# Altium PCB DIO_8SMA_8MCX_MEZZ.PcbDoc (part 4 of 4)
Units mm, origin at the board's own origin, x right, y up, seen from the top; angles counter-clockwise.
Board outline 143 x 98.9 mm, 4 copper layers (Top Layer, Layer 1, Layer 2, Bottom Layer), stack 1.57 mm thick; 303 components, 168 nets, 944 pads, 487 vias.
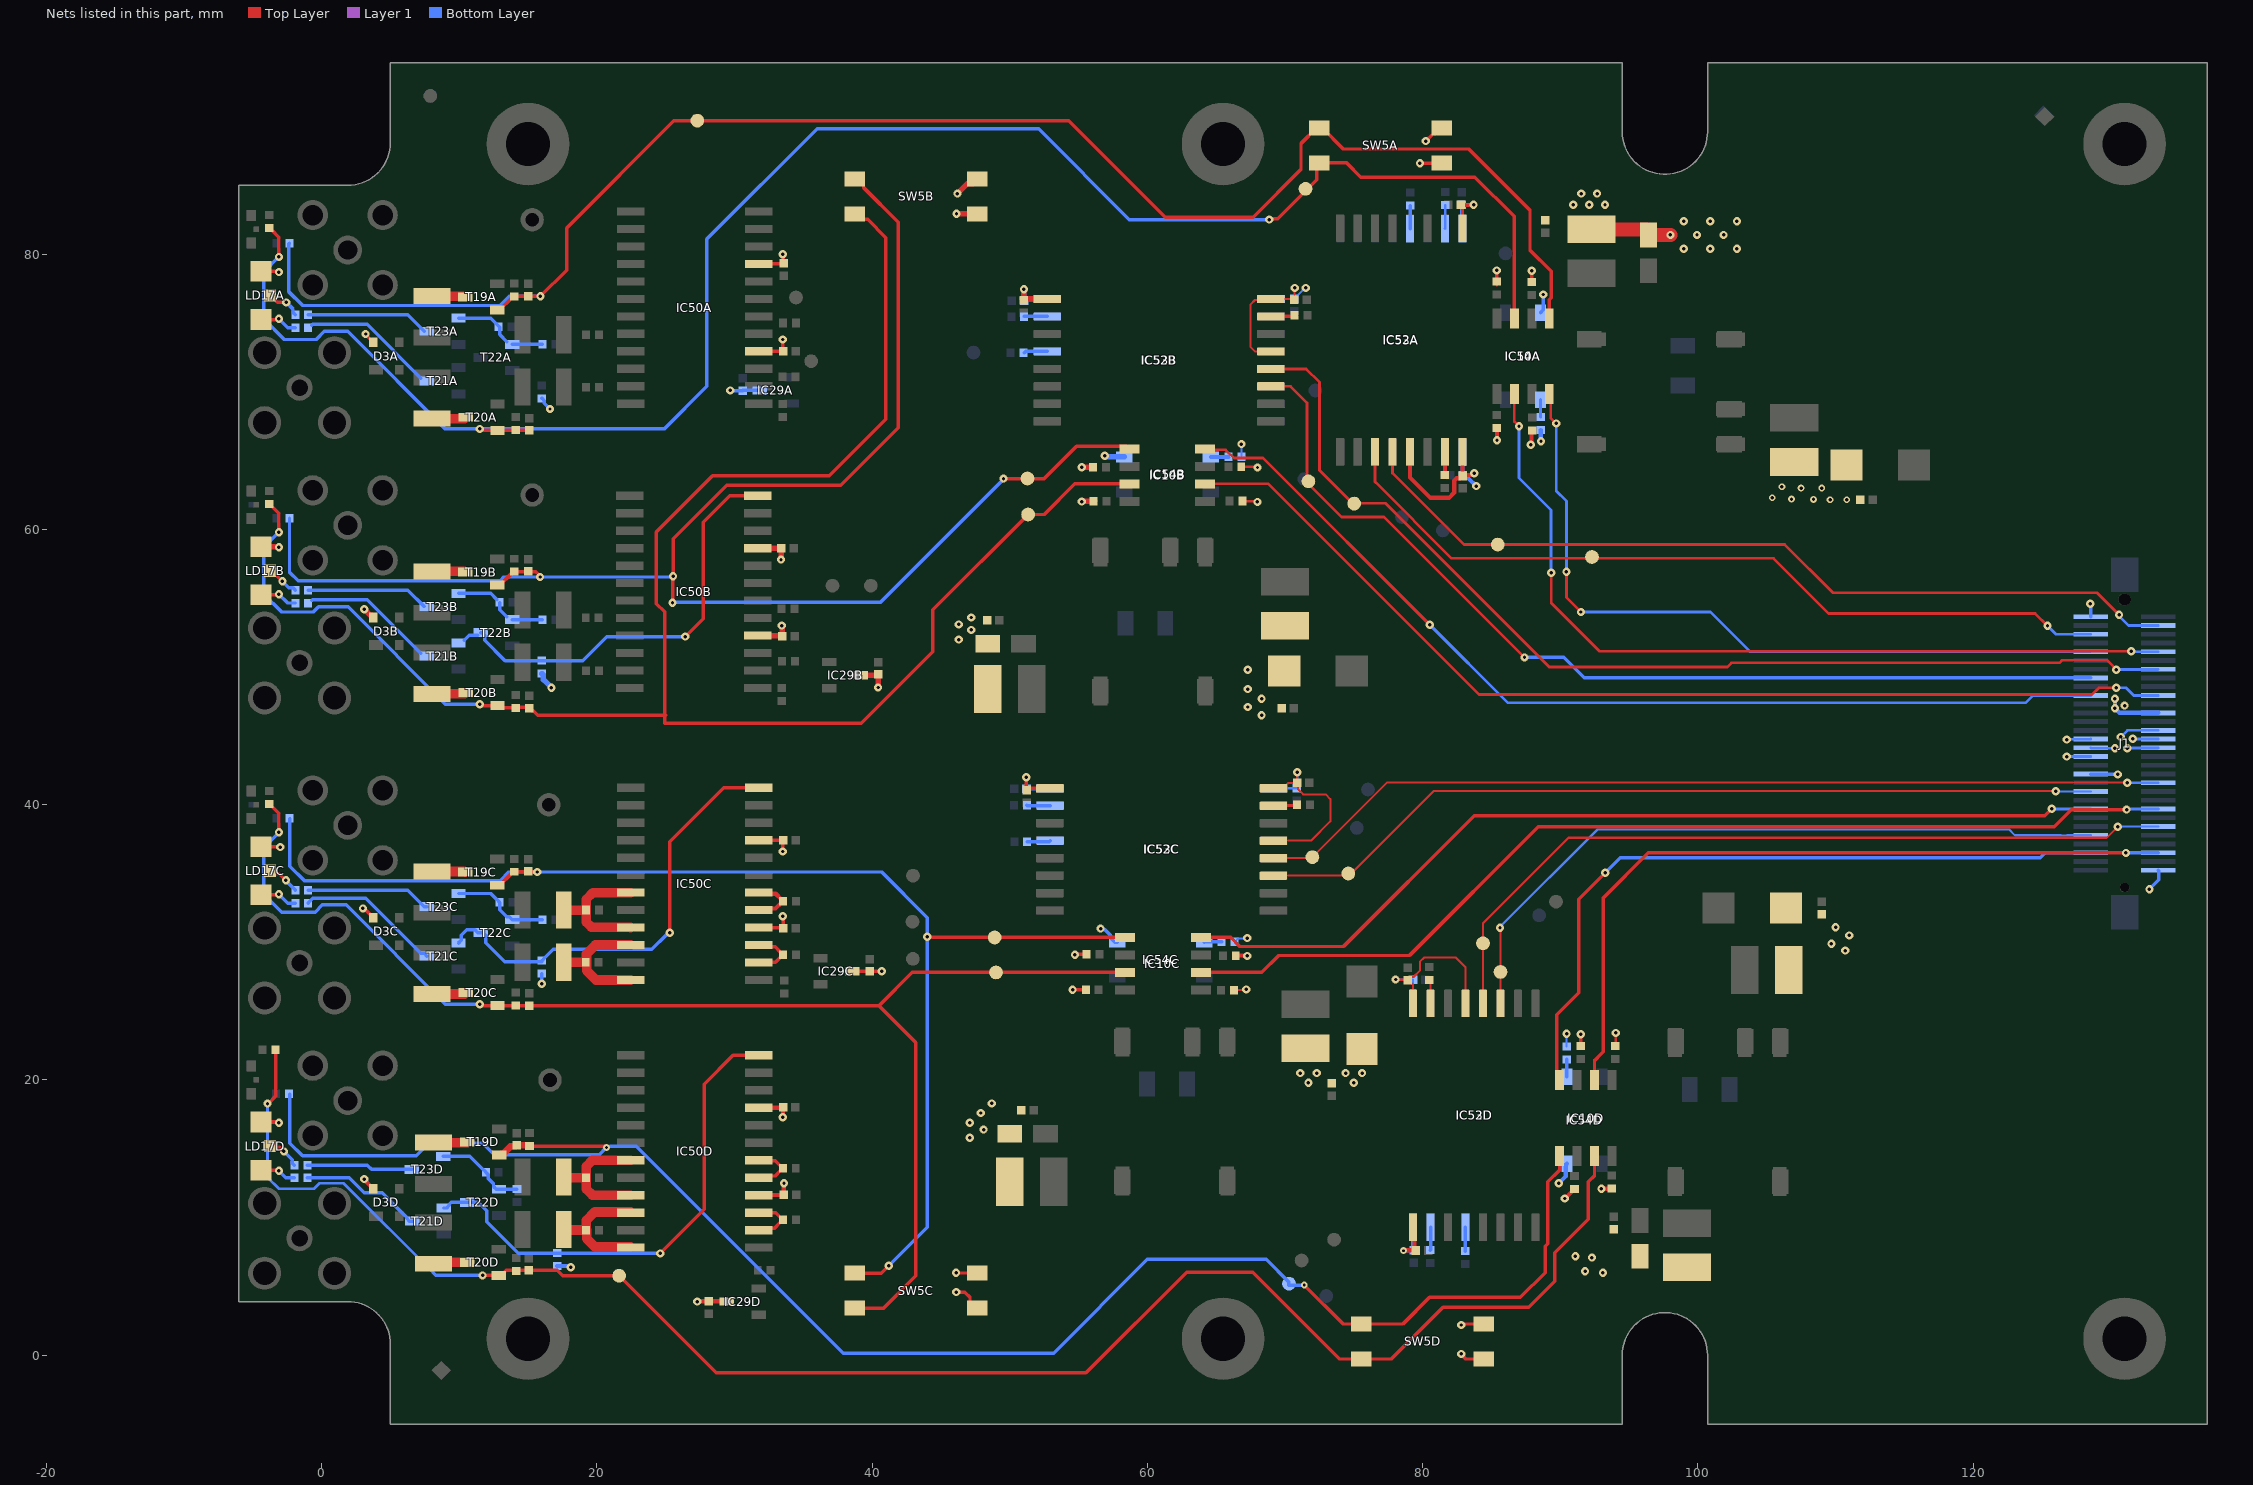
[diagram p5: the nets of this part, all layers, seen from the top]

## Via types
v1: diameter 0.6, hole 0.25, Top Layer to Bottom Layer, tented both sides, 472 vias
v2: diameter 0.5, hole 0.25, Top Layer to Bottom Layer, tented both sides, 8 vias
v3: diameter 0.5, hole 0.2, Top Layer to Bottom Layer, tented both sides, 7 vias

## Nets (pads, with @x,y where several pads share a name; then routed paths per layer and width w, separated by ;. In a path a pad name is that pad's centre, name@x,y a point inside that pad or via, vN(x,y) a via of type N, cw(c..) or ccw(c..) an arc to the next point about the centre after c; other vN are vias at no path point) (continued)
NetIC50B_24: IC50B.24 R220B.1 T21B.1 T22B.3 | length 31.4
  Top Layer w0.25: v1(26.431,52.215) 27.731,53.515 27.731,60.515 29.666,62.45 IC50B.24@31.681,62.45
  Bottom Layer w0.25: T21B.1@10.363,51.95 10.717,52.304 T22B.3@11.354,52.304 ; T22B.3@11.55,52.5 11.654,52.5 11.854,52.3 11.854,51.946 13.33,50.47 R220B.1@16,50.47 18.986,50.47 20.731,52.215 v1(26.431,52.215)
NetIC50C_7: IC50C.7 IC50C.9 R203C.2 R206C.2 | length 10.1
  Top Layer w0.7: R203C.2@17.605,32.345 R206C.2@19.23,32.345 ; IC50C.9@22.45,31.075 22.425,31.1 19.6,31.1 19.23,31.47 R206C.2@19.23,32.345 ; IC50C.7@22.45,33.615 19.715,33.615 19.23,33.13 R206C.2@19.23,32.345
NetIC50C_10: IC50C.10 IC50C.12 R208C.2 R210C.2 | length 9.8
  Top Layer w0.7: R208C.2@17.6,28.55 R210C.2@19.215,28.55 ; IC50C.12@22.45,27.265 19.935,27.265 19.269,27.931 19.269,28.496 19.23,28.535 19.248,28.553 19.248,29.16 19.893,29.805 IC50C.10@22.45,29.805
NetIC50C_14: IC50C.14 IC50C.15 R204C.1 | length 4.1
  Top Layer w0.25: IC50C.14@31.75,28.535 31.763,28.549 32.979,28.549 33.345,28.915 33.365,28.915 33.53,29.08 R204C.1@33.53,29.1 33.53,29.12 33.365,29.285 33.345,29.285 32.952,29.678 31.878,29.678 IC50C.15@31.75,29.805
NetIC50C_17: IC50C.17 IC50C.18 R205C.1 | length 4.1
  Top Layer w0.3: IC50C.17@31.75,32.345 31.855,32.451 32.981,32.451 33.37,32.84 33.39,32.84 33.53,32.98 R205C.1@33.53,33 33.53,33.02 33.39,33.16 33.37,33.16 33,33.53 31.836,33.53 IC50C.18@31.75,33.615
NetIC50C_24: IC50C.24 R220C.1 T21C.1 T22C.3 | length 32.6
  Top Layer w0.25: v1(25.3,30.7) 25.3,37.3 29.235,41.235 IC50C.24@31.75,41.235
  Bottom Layer w0.25: T21C.1@9.95,29.95 10.144,30.144 10.144,30.504 10.545,30.904 11.146,30.904 11.35,30.7 11.74,30.7 11.94,30.5 11.94,29.977 13.316,28.6 R220C.1@16,28.6 ; R220C.1@16,28.67 16.02,28.67 16.185,28.835 16.185,28.854 16.831,29.5 24,29.5 25.025,30.525 25.03,30.525 25.139,30.634 v1@25.139,30.639
NetIC50D_7: IC50D.7 IC50D.9 R203D.2 R206D.2 | length 10.1
  Top Layer w0.7: R203D.2@17.6,12.95 17.657,12.893 R206D.2@19.223,12.893 ; R206D.2@19.23,12.893 19.23,13.73 19.671,14.171 IC50D.7@22.447,14.171 ; R206D.2@19.23,12.9 19.23,12.07 19.669,11.631 IC50D.9@22.447,11.631
NetIC50D_10: IC50D.10 IC50D.12 R208D.2 R210D.2 | length 9.8
  Top Layer w0.7: R208D.2@17.634,9.099 R210D.2@19.23,9.099 ; IC50D.12@22.45,7.865 19.875,7.865 19.261,8.48 19.261,9.119 19.23,9.15 19.23,9.79 19.846,10.405 IC50D.10@22.45,10.405
NetIC50D_14: IC50D.14 IC50D.15 R204D.1 | length 4.1
  Top Layer w0.25: IC50D.14@31.747,9.091 31.899,9.244 32.925,9.244 33.33,9.649 33.35,9.649 33.515,9.814 R204D.1@33.515,9.834 33.515,9.854 33.35,10.019 33.33,10.019 32.988,10.361 IC50D.15@31.747,10.361
NetIC50D_17: IC50D.17 IC50D.18 R205D.1 | length 4.1
  Top Layer w0.25: IC50D.17@31.747,12.901 31.87,13.025 32.954,13.025 33.327,13.398 33.347,13.398 33.512,13.563 R205D.1@33.512,13.583 33.512,13.603 33.347,13.768 33.327,13.768 32.975,14.12 31.798,14.12 IC50D.18@31.747,14.171
NetIC50D_24: IC50D.24 R220D.1 T21D.1 T22D.3 | length 36.4
  Top Layer w0.25: v1(24.6,7.4) 27.8,10.6 27.8,19.7 29.891,21.791 IC50D.24@31.747,21.791
  Bottom Layer w0.25: T21D.1@8.883,10.7 9.083,10.7 9.283,10.9 9.283,10.967 9.429,11.114 T22D.3@10.589,11.114 ; T22D.3@10.592,11.11 11.39,11.11 12,10.5 12,9.688 14.288,7.4 16.2,7.4 v1(24.6,7.4)
NetIC52A_15: IC52A.15 R209A.1 | length 1.7
  Top Layer w0.3: IC52A.15@81.625,65.642 81.625,63.96 R209A.1@81.641,63.943
NetIC52B_15: IC52B.15 R209B.1 | length 1.7
  Top Layer w0.25: IC52B.15@68.974,75.492 70.657,75.492 R209B.1@70.64,75.475
NetIC52C_15: IC52C.15 R209C.1 | length 1.7
  Top Layer w0.25: IC52C.15@69.174,39.942 R209C.1@70.857,39.942
NetIC52D_15: IC52D.15 R209D.1 | length 1.7
  Top Layer w0.15: R209D.1@80.558,27.257 80.558,25.574 IC52D.15@80.575,25.558
NetIC53A_13: IC53A.13 R216A.2 | length 1.7
  Bottom Layer w0.25: IC53A.13@79.085,81.858 79.1,81.872 R216A.2@79.1,83.53
NetIC53A_15: IC53A.15 R214A.2 | length 1.7
  Bottom Layer w0.2: IC53A.15@81.625,81.858 81.65,81.883 R214A.2@81.65,83.563
NetIC53B_13: IC53B.13 R216B.2 | length 1.7
  Bottom Layer w0.25: R216B.2@51.07,72.85 51.155,72.935 IC53B.13@52.742,72.935
NetIC53B_15: IC53B.15 R214B.2 | length 1.7
  Bottom Layer w0.25: R214B.2@51.037,75.5 51.062,75.475 IC53B.15@52.742,75.475
NetIC53C_13: IC53C.13 R216C.2 | length 1.7
  Bottom Layer w0.25: R216C.2@51.27,37.3 52.857,37.3 IC53C.13@52.942,37.385
NetIC53C_15: IC53C.15 R214C.2 | length 1.7
  Bottom Layer w0.25: R214C.2@51.237,39.95 51.262,39.925 IC53C.15@52.942,39.925
NetIC53D_13: IC53D.13 R216D.2 | length 1.7
  Bottom Layer w0.25: R216D.2@83.1,7.57 83.1,9.294 IC53D.13@83.115,9.308
NetIC53D_15: IC53D.15 R214D.2 | length 1.7
  Bottom Layer w0.25: R214D.2@80.55,7.637 80.575,7.662 IC53D.15@80.575,9.308
NetIC54A_1: IC54A.1 R221A.1 | length 1.3
  Bottom Layer w0.2: IC54A.1@88.564,69.44 88.564,68.17 R221A.1@88.578,68.157
NetIC54B_1: IC54B.1 R221B.1 | length 1.3
  Bottom Layer w0.3: IC54B.1@64.618,65.27 65.888,65.27 R221B.1@65.901,65.283
NetIC54C_1: IC54C.1 R221C.1 | length 1.3
  Bottom Layer w0.25: IC54C.1@64.118,30.02 64.131,30.033 R221C.1@65.401,30.033
NetIC54D_1: IC54D.1 R221D.1 | length 1.3
  Bottom Layer w0.25: R221D.1@90.466,21.501 90.48,21.488 IC54D.1@90.48,20.218
NetLD17A_2: LD17A.2 R217A.2 | length 2.6
  Top Layer w0.25: LD17A.2@-3.75,77 -3.425,76.675 -3.378,76.675 -3.2,76.497 v1(-2.571,76.497)
  Bottom Layer w0.25: v1@-2.556,76.497 -2.074,76.014 -2.074,75.76 R217A.2@-1.909,75.595
NetLD17A_3: LD17A.3 R215A.2 | length 2.8
  Top Layer w0.25: LD17A.3@-4.4,75.25 -3.15,75.25 v1(-3.1,75.3)
  Bottom Layer w0.25: v1(-3.1,75.3) -2.454,74.654 R215A.2@-1.909,74.654
NetLD17B_2: LD17B.2 R217B.2 | length 2.4
  Top Layer w0.25: LD17B.2@-3.75,57 -3.425,56.675 -3.285,56.675 v1(-2.845,56.235)
  Bottom Layer w0.25: v1(-2.845,56.235) -2.372,55.762 -2.074,55.762 -1.909,55.597 R217B.2@-1.909,55.595
NetLD17B_3: LD17B.3 R215B.2 | length 2.8
  Top Layer w0.25: LD17B.3@-4.4,55.25 -3.15,55.25 v1(-3.1,55.3)
  Bottom Layer w0.25: v1(-3.1,55.3) -2.454,54.654 R215B.2@-1.909,54.654
NetLD17C_2: LD17C.2 R217C.2 | length 2.4
  Top Layer w0.25: LD17C.2@-3.75,35.2 -3.541,34.991 -3.071,34.991 v1(-2.589,34.509)
  Bottom Layer w0.25: v1(-2.589,34.509) -2.589,34.491 -2.078,33.98 -2.074,33.98 -1.909,33.815 R217C.2@-1.909,33.795
NetLD17C_3: LD17C.3 R215C.2 | length 2.8
  Top Layer w0.25: LD17C.3@-4.4,33.45 -3.15,33.45 v1(-3.1,33.5)
  Bottom Layer w0.25: v1(-3.1,33.5) -2.454,32.854 R215C.2@-1.909,32.854
NetLD17D_2: LD17D.2 R217D.2 | length 2.5
  Top Layer w0.25: LD17D.2@-3.75,15.2 -3.65,15.1 -3.056,15.1 -2.767,14.812 v1(-2.734,14.812)
  Bottom Layer w0.25: v1(-2.734,14.812) -2.135,14.212 -2.135,13.965 R217D.2@-1.97,13.8
NetLD17D_3: LD17D.3 R215D.2 | length 2.7
  Top Layer w0.25: LD17D.3@-4.4,13.45 -3.15,13.45 v1(-3.1,13.4)
  Bottom Layer w0.25: v1(-3.1,13.4) -2.6,12.9 R215D.2@-1.97,12.9
NetR207A_1: R207A.1 T19A.3 | length 2.4
  Top Layer w0.7: R207A.1@8.033,76.95 T19A.3@10.4,76.95
NetR207B_1: R207B.1 T19B.3 | length 2.4
  Top Layer w0.7: R207B.1@8.033,56.95 T19B.3@10.4,56.95
NetR207C_1: R207C.1 T19C.3 | length 2.4
  Top Layer w0.7: R207C.1@8.033,35.15 10.4,35.15 T19C.3@10.45,35.1
NetR207D_1: R207D.1 T19D.3 | length 2.5
  Top Layer w0.7: R207D.1@8.133,15.45 10.6,15.45 T19D.3@10.65,15.5
NetR211A_1: R211A.1 T20A.3 | length 2.3
  Top Layer w0.7: R211A.1@8.033,68.05 T20A.3@10.383,68.05
NetR211B_1: R211B.1 T20B.3 | length 2.3
  Top Layer w0.7: R211B.1@8.033,48.05 T20B.3@10.383,48.05
NetR211C_1: R211C.1 T20C.3 | length 2.5
  Top Layer w0.7: R211C.1@8.033,26.25 10.383,26.25 T20C.3@10.483,26.35
NetR211D_1: R211D.1 T20D.3 | length 2.5
  Top Layer w0.7: R211D.1@8.133,6.65 8.233,6.75 T20D.3@10.583,6.75
NetR215A_1: R215A.1 T21A.3 | length 9.6
  Bottom Layer w0.25: R215A.1@-0.719,74.839 -0.657,74.9 3.32,74.9 T21A.3@7.22,71
NetR215B_1: R215B.1 T21B.3 | length 9.6
  Bottom Layer w0.25: R215B.1@-0.719,54.839 -0.657,54.9 3.32,54.9 T21B.3@7.22,51
NetR215C_1: R215C.1 T21C.3 | length 10.5
  Bottom Layer w0.25: R215C.1@-0.969,32.854 -0.969,32.874 -0.632,33.21 -0.565,33.21 -0.559,33.216 3.204,33.216 7.22,29.2 7.45,29.2 T21C.3@7.65,29
NetR215D_1: R215D.1 T21D.3 | length 9
  Bottom Layer w0.25: R215D.1@-1.03,12.9 2,12.9 3.1,11.8 4.398,11.8 5.953,10.245 6.183,10.015 6.183,9.95 6.383,9.75 T21D.3@6.583,9.75
NetR217A_1: R217A.1 T23A.3 | length 8.9
  Bottom Layer w0.25: R217A.1@-0.969,75.595 6.255,75.595 T23A.3@7.45,74.4
NetR217B_1: R217B.1 T23B.3 | length 8.9
  Bottom Layer w0.25: R217B.1@-0.969,55.595 6.255,55.595 T23B.3@7.45,54.4
NetR217C_1: R217C.1 T23C.3 | length 9.1
  Bottom Layer w0.25: R217C.1@-0.969,33.795 6.255,33.795 7.45,32.6 T23C.3@7.65,32.6
NetR217D_1: R217D.1 T23D.3 | length 7.7
  Bottom Layer w0.25: R217D.1@-1.03,13.8 3.331,13.8 3.631,13.5 T23D.3@6.554,13.5
NetR222A_1: R222A.1 R223A.2 T22A.1 T23A.1 | length 6.7
  Bottom Layer w0.25: T23A.1@9.95,75.35 12.28,75.35 12.939,74.691 12.939,74.161 T22A.1@13.45,73.65 ; T22A.1@13.85,73.45 R222A.1@16.037,73.45
NetR222B_1: R222B.1 R223B.2 T22B.1 T23B.1 | length 6.4
  Bottom Layer w0.25: T23B.1@9.95,55.35 12.28,55.35 R223B.2@12.745,54.885 ; R223B.2@12.939,54.691 12.939,54.161 T22B.1@13.45,53.65 ; T22B.1@13.85,53.45 R222B.1@16.037,53.45
NetR222C_1: R222C.1 R223C.2 T22C.1 T23C.1 | length 7.2
  Bottom Layer w0.25: T23C.1@9.95,33.55 12.28,33.55 12.745,33.085 12.765,33.085 12.93,32.92 R223C.2@12.93,32.9 12.939,32.891 12.939,32.361 13.45,31.85 13.65,31.85 T22C.1@13.85,31.65 R222C.1@16.037,31.65
NetR222D_1: R222D.1 R223D.2 T22D.1 T23D.1 | length 6.6
  Bottom Layer w0.25: T23D.1@8.85,14.45 10.78,14.45 11.745,13.485 11.765,13.485 11.93,13.32 R223D.2@11.93,13.3 12.095,13.135 12.095,12.857 12.492,12.46 12.492,12.26 12.692,12.06 T22D.1@12.892,12.06 R222D.1@14.19,12.06
OUT_CH9: B2A.1 IC52A.12 J1.4 | length 61.8
  Top Layer w0.2: IC52A.12@77.815,65.642 77.815,64.09 83.005,58.9 B2A.1@85.456,58.9 106.3,58.9 109.8,55.4 129,55.4 v1(130.6,53.8)
  Bottom Layer w0.2: v1(130.6,53.8) 130.6,53.7 131.277,53.023 J1.4@133.45,53.023
OUT_CH10: B4A.1 IC52A.11 J1.5 | length 58.7
  Top Layer w0.2: 76.545,63.455 IC52A.11@76.545,65.642 ; 76.6,63.4 82.1,57.9 92.3,57.9 105.5,57.9 109.5,53.9 124.5,53.9 v1(125.4,53)
  Bottom Layer w0.2: v1(125.4,53) 126.013,52.387 J1.5@128.55,52.387
OUT_CH11: B2B.1 IC52B.12 J1.14 | length 77.7
  Top Layer w0.2: IC52B.12@68.958,71.665 71.535,71.665 72.5,70.7 72.5,64.3 74.9,61.9 77.3,61.9 89.2,50 102.139,50 102.446,50.307 126.281,50.307 126.474,50.5 129.71,50.5 130.4,49.81 v1(130.4,49.8)
  Bottom Layer w0.2: v1(130.4,49.8) 130.424,49.824 133.426,49.824 J1.14@133.45,49.847
OUT_CH12: B4B.1 IC52B.11 J1.15 | length 71.8
  Top Layer w0.2: IC52B.11@68.958,70.395 70.405,70.395 71.6,69.2 71.6,63.4 74.1,60.9 77.2,60.9 v1(87.4,50.7)
  Bottom Layer w0.25: v1(87.4,50.7) 90.258,50.7 91.739,49.219 113.544,49.219 113.55,49.212 J1.15@128.55,49.212
OUT_CH13: B2C.1 IC52C.12 J1.40 | length 66.6
  Top Layer w0.15: IC52C.12@69.158,36.115 71.915,36.115 77.405,41.605 131.195,41.605 v1(131.2,41.6)
  Bottom Layer w0.15: v1(131.2,41.6) 131.204,41.596 133.446,41.596 J1.40@133.45,41.593
OUT_CH14: B4C.1 IC52C.11 J1.41 | length 62
  Top Layer w0.15: IC52C.11@69.158,34.845 74.645,34.845 80.8,41 125.987,41 v1(126,40.987)
  Bottom Layer w0.15: v1(126,40.987) 126.03,40.957 J1.41@128.55,40.957
OUT_CH15: B2D.1 IC52D.12 J1.50 | length 57.8
  Top Layer w0.15: IC52D.12@84.385,25.558 84.385,31.385 90.6,37.6 129.7,37.6 v1(130.5,38.4)
  Bottom Layer w0.15: v1(130.5,38.4) 130.509,38.409 133.441,38.409 J1.50@133.45,38.417
OUT_CH16: B4D.1 IC52D.11 J1.51 | length 51.6
  Top Layer w0.15: v1(85.622,31.056) 85.655,31.024 IC52D.11@85.655,25.558
  Bottom Layer w0.15: v1(85.622,31.056) 85.622,31.122 92.7,38.2 122.613,38.2 123.03,37.782 126.375,37.782 126.383,37.775 126.817,37.775 126.825,37.782 J1.51@128.55,37.782
P3V3: C77A.2 C77B.2 C77C.2 C77D.2 C78A.2 C78B.2 C78C.2 C78D.2 IC52A.13 IC52A.16 IC52B.13 IC52B.16 IC52C.13 IC52C.16 IC52D.13 IC52D.16 IC53A.1 IC53B.1 IC53C.1 IC53D.1 J1.1 J1.24 J1.37 J1.60 R29A.2 R29B.2 R29C.2 R29D.2 R34A.2 R34B.2 R34C.2 R34D.2 R221A.2 R221B.2 R221C.2 R221D.2 | length 73.3
  Top Layer w0.15: R34C.2@66.302,26.55 67.153,26.55 v1(67.183,26.58) ; R29B.2@66.821,64.542 66.835,64.557 67.943,64.557 v1(68,64.5) ; R34B.2@66.938,62.047 67.95,62.047 v1(67.999,61.999) ; IC52B.13@68.958,72.935 67.815,72.935 67.5,73.25 67.5,76.35 67.821,76.671 68.884,76.671 IC52B.16@68.958,76.745 70.638,76.745 70.683,76.7 70.683,77.533 v1(70.7,77.55) ; IC52C.13@69.158,37.385 71.885,37.385 73.3,38.8 73.3,40.4 72.95,40.75 71.327,40.75 70.94,41.138 70.94,41.523 C77C.2@70.883,41.579 ; IC52C.16@69.858,41.195 70.158,41.495 70.158,41.497 70.246,41.585 C77C.2@70.869,41.585 ; C77C.2@70.877,41.585 C77C.2@70.883,41.579 ; C77C.2@70.883,41.543 C77C.2@70.883,41.579 ; v1@70.883,42.351 70.883,41.959 ; 70.888,41.964 70.883,41.959 ; v1@78.049,27.283 C77D.2@78.967,27.283 ; C77D.2@78.933,27.249 C77D.2@78.967,27.283 ; IC52D.16@79.305,25.558 79.305,26.926 79.217,27.014 79.168,27.014 78.981,27.2 78.981,27.283 C77D.2@78.967,27.283 ; IC52D.13@83.115,25.558 83.115,28.185 82.4,28.9 80.115,28.9 79.8,28.585 79.8,27.949 79.334,27.484 79.168,27.484 C77D.2@78.967,27.283 ; C77C.2@70.883,41.579 70.883,41.959
  Top Layer w0.2: R34D.2@94,22.47 94.033,22.503 v1(94.033,23.417)
  Top Layer w0.25: v1(91.491,23.315) 91.5,23.306 R29D.2@91.5,22.47
  Top Layer w0.3: R29C.2@66.42,29.043 67.232,29.043 v1(67.262,29.013) ; IC52A.13@79.085,65.642 79.085,63.78 80.565,62.3 81.924,62.3 82.297,62.673 82.297,63.547 82.473,63.723 82.759,63.723 C77A.2@82.919,63.883 ; IC52A.16@82.823,65.715 IC52A.16@82.895,65.642 82.895,63.962 C77A.2@82.877,63.944 ; C77A.2@82.969,63.919 82.995,63.945 83.545,63.945 83.675,64.075 v1(83.756,64.075) ; R34A.2@85.392,67.318 85.392,66.497 v1(85.4,66.489) ; v1(87.852,66.157) 87.9,66.205 87.9,67.151 R29A.2@87.949,67.2
  Layer 1 w0.25: v1@91.439,23.367 v1(91.491,23.315)
  Bottom Layer w0.15: R221C.2@66.341,30.033 66.341,30.053 66.556,30.268 66.631,30.268 66.644,30.281 67.228,30.281 v1(67.259,30.312) ; v1(66.836,66.205) 66.841,66.2 R221B.2@66.841,65.283 ; IC53B.1@68.968,76.745 IC53B.1@68.992,76.745 C78B.2@70.638,76.745 ; IC53C.1@69.192,41.195 70.862,41.195 C78C.2@70.867,41.2 70.888,41.221 v1(70.888,42.357) ; C78B.2@70.662,76.745 C78B.2@70.667,76.75 71.467,77.55 v1(71.5,77.55) ; v1@78.037,27.305 79.262,27.305 C78D.2@79.3,27.267 79.305,27.262 IC53D.1@79.305,25.558 ; v1(90.458,23.367) 90.466,23.358 R221D.2@90.466,22.441
  Bottom Layer w0.25: v1(128.5,54.6) 128.55,54.55 J1.1@128.55,53.657 ; J1.37@128.55,42.227 130.473,42.227 v1(130.5,42.2) ; v1@131,47.195 v1(131,47.2) ; v1(132.806,33.859) 133.495,34.548 133.495,35.193 133.45,35.238 J1.60@133.45,35.242
  Bottom Layer w0.3: IC53A.1@82.895,65.608 82.895,63.938 C78A.2@82.9,63.933 83.06,63.773 83.203,63.773 83.236,63.74 83.303,63.74 v1(83.893,63.15) ; R221A.2@88.578,67.217 88.578,66.422 v1(88.6,66.4)
  Bottom Layer w0.32: v1(130.3,47.705) v1(130.3,47.005) 130.633,46.672 J1.24@133.45,46.672
  other v1: 78.032,27.3
P5V0_ISOA: C32A.2 C33A.2 C42A.1 C43A.2 C56A.2 C76A.2 C88A.2 D3A.4 IC29A.3 IC50A.16 IC50A.21 IC52A.1 IC53A.16 IC54A.6 L5A.1 LD17A.1 R87A.1 R88A.1 R220A.2 SW5A.1 SW5A.2 | length 28.2
  Top Layer w0.25: LD17A.1@-4.4,78.75 -3.15,78.75 v1(-3.1,78.7) ; v1(3.2,74.2) 3.2,74.15 3.525,73.825 3.575,73.825 3.75,73.65 D3A.4@3.75,73.6 ; IC50A.16@31.75,72.94 33.44,72.94 33.5,73 v1(33.5,73.8) ; IC50A.21@31.75,79.29 C32A.2@33.526,79.29 ; v1(33.5,80) 33.536,79.964 33.536,79.387 C32A.2@33.612,79.311 ; v1(79.8,86.6) 81.363,86.6 SW5A.1@81.393,86.63 ; v1(80.227,88.22) 80.24,88.22 80.766,88.745 80.968,88.745 SW5A.2@81.393,89.17 ; IC52A.1@82.895,81.892 82.895,83.472 82.8,83.567 83.667,83.567 v1(83.7,83.6) ; v1(85.378,78.822) 85.394,78.805 R88A.1@85.394,77.76 ; v1(87.935,78.796) 87.938,78.793 R87A.1@87.938,77.965
  Top Layer w1: L5A.1@92.278,81.8 96.275,81.8 96.4,81.675 C42A.1@96.4,81.4 v1(98,81.4)
  Bottom Layer w0.25: R220A.2@16,69.53 16.02,69.53 16.185,69.365 16.185,69.161 v1(16.595,68.75) ; v1(29.7,70.1) 29.709,70.091 C56A.2@30.591,70.091 30.6,70.1 IC29A.3@31.85,70.1 ; IC53A.16@82.895,81.858 82.85,81.903 C88A.2@82.85,83.583 83.683,83.583 v1(83.7,83.6) ; IC54A.6@88.564,75.74 88.775,75.951 v1@88.775,77.061
  other v1: 88.766,77.07 98.967,80.4 100.9,80.4 102.833,80.4 99.933,81.4 101.867,81.4 98.967,82.4 100.9,82.4 102.833,82.4 90.95,83.6 92.1,83.6 93.25,83.6 91.525,84.4 92.675,84.4
P5V0_ISOB: C32B.2 C33B.2 C42B.1 C43B.2 C56B.2 C76B.2 C88B.2 D3B.4 IC29B.3 IC50B.16 IC50B.21 IC52B.1 IC53B.16 IC54B.6 L5B.1 LD17B.1 R87B.1 R88B.1 R220B.2 SW5B.1 SW5B.2 | length 22.3
  Top Layer w0.4: LD17B.1@-4.4,58.75 -4.393,58.743 -3.197,58.743 -3.154,58.7 v1(-3.1,58.7) ; v1(3.103,54.2) 3.553,53.75 3.65,53.75 3.75,53.65 D3B.4@3.75,53.6 ; IC50B.16@31.681,52.29 33.477,52.29 33.481,52.286 33.456,52.311 33.456,52.99 v1(33.431,53.015) ; IC50B.21@31.681,58.64 C32B.2@33.45,58.64 ; v1(33.379,57.813) 33.395,57.829 33.395,58.617 C32B.2@33.406,58.628 ; IC29B.3@39.181,49.415 C56B.2@40.231,49.415 ; v1(40.431,48.515) C56B.2@40.431,49.365 ; v1(46.13,82.93) SW5B.1@47.65,82.93 ; v1(46.2,84.4) 46.92,85.12 47.3,85.12 SW5B.2@47.65,85.47 ; v1(51.031,77.445) 51.031,76.652 51.033,76.65 51.128,76.745 IC52B.1@52.708,76.745 ; v1(55.226,64.525) 55.242,64.509 R87B.1@56.061,64.509 ; v1(55.235,62.025) 55.259,62.049 R88B.1@56.183,62.049
  Bottom Layer w0.4: R220B.2@16,49.53 16.02,49.53 16.11,49.44 16.11,49.09 v1(16.7,48.5) ; C88B.2@50.916,76.745 IC53B.16@52.742,76.745 ; C88B.2@51.028,76.796 51.028,77.442 v1(51.031,77.445) ; v1(56.9,65.35) 56.954,65.35 57.034,65.27 IC54B.6@58.318,65.27
  other v1: 46.3,52 47.2,52.7 46.3,53.1 47.2,53.6
P5V0_ISOC: C32C.2 C33C.2 C42C.1 C43C.2 C56C.2 C76C.2 C88C.2 D3C.4 IC29C.3 IC50C.16 IC50C.21 IC52C.1 IC53C.16 IC54C.6 L5C.1 LD17C.1 R87C.1 R88C.1 R220C.2 SW5C.1 SW5C.2 | length 23.5
  Top Layer w0.25: LD17C.1@-4.4,36.95 -3.025,36.95 v1(-2.995,36.92) ; v1(3.007,32.467) 3.083,32.467 3.525,32.025 3.575,32.025 3.75,31.85 D3C.4@3.75,31.8 ; IC50C.16@31.75,31.075 33.512,31.075 33.558,31.029 33.558,31.842 v1(33.5,31.9) ; IC50C.21@31.75,37.425 31.761,37.414 33.504,37.414 33.504,36.604 v1(33.5,36.6) ; IC29C.3@38.55,27.9 39.815,27.9 C56C.2@39.827,27.888 39.838,27.9 v1(40.7,27.9) ; v1(46.1,6) 46.124,5.976 SW5C.2@47.65,5.976 ; v1(46.121,4.587) 46.733,4.587 47.111,4.209 47.111,3.855 47.566,3.4 SW5C.1@47.92,3.4 ; v1(51.2,42) 51.2,41.133 51.233,41.1 51.328,41.195 IC52C.1@52.908,41.195 ; v1(54.564,26.563) 54.577,26.55 55.48,26.55 R88C.1@55.53,26.5 ; v1(54.734,29.095) 54.759,29.12 55.568,29.12 R87C.1@55.588,29.141
  Bottom Layer w0.25: v1(16,27) R220C.2@16,27.73 ; v1(51.2,42) 51.217,41.983 C88C.2@51.217,41.15 52.897,41.15 IC53C.16@52.942,41.195 ; v1(56.6,31) 56.667,30.933 56.905,30.933 57.343,30.495 57.343,30.295 57.618,30.02 IC54C.6@57.818,30.02
  other v1: 47.1,15.8 48.1,16.4 47.1,16.9 47.9,17.6 48.7,18.3
P5V0_ISOD: C32D.2 C33D.2 C42D.1 C43D.2 C56D.2 C76D.2 C88D.2 D3D.4 IC29D.3 IC50D.16 IC50D.21 IC52D.1 IC53D.16 IC54D.6 L5D.1 LD17D.1 R87D.1 R88D.1 R220D.2 SW5D.1 SW5D.2 | length 22.7
  Top Layer w0.25: v1(82.8,0.1) 82.8,0.051 83.121,-0.27 SW5D.1@84.45,-0.27 ; v1(82.8,2.2) 82.895,2.2 82.965,2.27 SW5D.2@84.45,2.27
  Top Layer w0.3: LD17D.1@-4.4,16.95 -3.15,16.95 v1(-3.1,16.9) ; v1(3.1,12.8) 3.1,12.75 3.55,12.3 3.6,12.3 3.75,12.15 D3D.4@3.75,12.1 ; v1(27.3,3.9) 27.328,3.928 C56D.2@28.148,3.928 29.422,3.928 IC29D.3@29.45,3.9 ; IC50D.16@31.747,11.631 33.564,11.631 C33D.2@33.583,11.65 33.583,12.483 v1(33.6,12.5) ; IC50D.21@31.747,17.981 33.475,17.981 C32D.2@33.529,18.035 33.515,18.021 33.515,17.315 v1(33.5,17.3) ; v3(78.6,7.6) 78.633,7.633 79.4,7.633 79.4,9.213 IC52D.1@79.305,9.308 ; v1(90.321,11.387) 90.333,11.387 90.872,11.927 90.872,11.938 91.012,12.078 R87D.1@91.024,12.078 ; v1(92.986,12.09) 92.996,12.1 93.712,12.1 R88D.1@93.722,12.09
  Bottom Layer w0.3: R220D.2@17.11,6.48 17.939,6.48 18.019,6.4 v1(18.1,6.4) ; v3(78.6,7.6) 79.332,7.6 C88D.2@79.35,7.617 79.305,7.662 IC53D.16@79.305,9.308 ; v1(89.88,12.489) 90.4,13.009 90.4,13.838 IC54D.6@90.48,13.918
  other v1: 93.1,6 91.8,6.1 92.3,7.1 91.1,7.2
P12V0: C39A.1 C39B.1 C39C.1 C39D.1 C41A.2 C41B.2 C41C.2 C41D.2 J1.28 J1.29 J1.30 J1.31 J1.32 J1.33 L11A.2 L11B.2 L11C.2 L11D.2 | length 12.3
  Bottom Layer w0.2: v1(126.795,44.735) 126.811,44.751 128.534,44.751 J1.29@128.55,44.767 ; v1(126.8,43.5) 126.802,43.497 J1.33@128.55,43.497 ; J1.31@128.55,44.133 128.582,44.1 v1(130.3,44.1) ; v1(130.716,44.922) 131.197,45.402 J1.28@133.45,45.402 ; v1(131.2,44.1) 131.216,44.116 133.434,44.116 J1.32@133.45,44.133 ; v1(131.6,44.8) 131.633,44.767 J1.30@133.45,44.767
  other v1: 71.7,19.8 75,19.8 71.1,20.5 72.3,20.5 74.4,20.5 75.6,20.5 110.7,29.4 109.7,29.9 111,30.5 110,31.1 68.3,46.5 67.3,47.1 68.3,47.7 67.3,48.4 67.3,49.8
  other v2: 109.608,62.155 110.814,62.155 108.396,62.185 106.8,62.2 105.4,62.3 107.5,63 109,63 106.1,63.1
TERM_CH_9: IC10A.4 J1.9 | length 55
  Top Layer w0.2: IC10A.4@89.199,69.84 89.3,69.739 89.3,68.111 v1(89.709,67.702) ; v1(90.444,56.929) 90.444,55.056 v1(91.5,54)
  Bottom Layer w0.2: v1(89.709,67.702) 89.709,62.791 90.444,62.056 v1(90.444,56.929) ; v1(91.5,54) 100.9,54 103.783,51.117 J1.9@128.55,51.117
TERM_CH_10: IC10A.2 J1.10 | length 61.9
  Top Layer w0.2: IC10A.2@86.659,69.84 86.659,67.841 v1(87,67.5) ; v1(89.343,56.861) 89.343,54.657 92.85,51.15 v1(131.485,51.15)
  Bottom Layer w0.2: v1(87,67.5) 87,63.741 89.333,61.408 v1@89.333,56.861 ; v1(131.485,51.15) 131.518,51.117 J1.10@133.45,51.117
TERM_CH_11: IC10B.4 J1.19 | length 72.2
  Top Layer w0.2: IC10B.4@64.202,65.852 64.269,65.785 65.691,65.785 66.293,65.183 68.409,65.183 v1(80.518,53.074)
  Bottom Layer w0.2: v1(80.518,53.074) 86.192,47.4 123.8,47.4 124.342,47.942 J1.19@128.55,47.942
TERM_CH_12: IC10B.2 J1.20 | length 76
  Top Layer w0.2: IC10B.2@64.202,63.312 68.788,63.312 84.1,48 128.632,48 129.132,48.5 v1(130.4,48.5)
  Bottom Layer w0.2: v1(130.4,48.5) 131.1,48.5 131.25,48.35 131.572,48.028 131.658,47.942 J1.20@133.45,47.942
TERM_CH_13: IC10C.4 J1.45 | length 69.1
  Top Layer w0.25: IC10C.4@63.882,30.355 66.044,30.355 66.699,29.7 74.248,29.7 83.748,39.2 125.2,39.2 v1(125.7,39.7)
  Bottom Layer w0.25: v1(125.7,39.7) 125.712,39.688 J1.45@128.55,39.688
TERM_CH_14: IC10C.2 J1.46 | length 74.5
  Top Layer w0.25: IC10C.2@63.882,27.815 68.315,27.815 69.545,29.045 79.045,29.045 88.4,38.4 125.887,38.4 127.132,39.645 v1(131.142,39.645)
  Bottom Layer w0.25: v1(131.142,39.645) 131.184,39.688 J1.46@133.45,39.688
TERM_CH_15: IC10D.4 J1.55 | length 52.5
  Top Layer w0.25: IC10D.4@89.945,19.982 89.75,20.177 89.75,24.75 91.337,26.337 91.337,33.137 v1(93.26,35.06)
  Bottom Layer w0.25: v1(93.26,35.06) 94.345,36.145 124.878,36.145 125.245,36.512 J1.55@128.55,36.512
TERM_CH_16: IC10D.2 J1.56 | length 55.2
  Top Layer w0.25: IC10D.2@92.485,19.982 92.485,21.415 92.5,21.43 ; 92.52,21.43 92.685,21.595 92.685,21.609 93.125,22.048 93.125,33.225 96.4,36.5 v1(131.1,36.5)
  Bottom Layer w0.25: v1(131.1,36.5) 131.106,36.506 133.444,36.506 J1.56@133.45,36.512
TERM_IO0A: B8A.1 C95A.2 IC10A.5 R212A.1 R219A.1 SW5A.3 T19A.1 | length 122.2
  Top Layer w0.25: T19A.1@12.95,75.95 R219A.1@13.765,76.765 ; R219A.1@14,76.93 C95A.2@14.98,76.93 ; C95A.2@15.069,76.931 15.892,76.931 v1(15.9,76.94) 17.8,78.839 17.8,81.9 25.6,89.7 B8A.1@27.3,89.7 54.3,89.7 61.309,82.691 67.691,82.691 71.162,86.162 71.162,88.039 72.293,89.17 SW5A.3@72.493,89.17 72.693,89.17 74.223,87.64 83.36,87.64 87.8,83.2 87.8,80.3 89.341,78.759 89.341,76.832 89.199,76.691 IC10A.5@89.199,75.34
  Bottom Layer w0.25: R212A.1@-2.33,80.8 -2.4,80.73 -2.4,77.287 -1.382,76.269 12.969,76.269 13.64,76.94 v1(15.9,76.94)
TERM_IO0B: B8B.1 C95B.2 IC10B.5 R212B.1 R219B.1 SW5B.3 T19B.1 | length 117.2
  Top Layer w0.25: T19B.1@12.95,55.95 R219B.1@13.765,56.765 ; R219B.1@14,56.93 C95B.2@14.98,56.93 ; C95B.2@15.069,56.931 15.566,56.931 15.874,56.623 v1(15.874,56.543) ; v1(25.498,54.682) 25.53,54.714 25.53,56.584 v1(25.541,56.595) 25.541,59.324 29.442,63.226 37.726,63.226 41.9,67.4 41.9,82.32 39.375,84.845 39.375,85.045 38.95,85.47 SW5B.3@38.75,85.47 ; v1(49.548,63.699) 50.9,63.699 52.499,63.699 54.85,66.05 58.504,66.05 IC10B.5@58.702,65.852
  Bottom Layer w0.25: R212B.1@-2.33,60.8 -2.33,56.89 -1.708,56.269 12.969,56.269 13.243,56.543 25.489,56.543 v1(25.541,56.595) ; v1(25.498,54.682) 25.525,54.708 40.575,54.708 ; 40.591,54.691 49.548,63.648 v1(49.548,63.699)
TERM_IO0C: B8C.1 C95C.2 IC10C.5 R212C.1 R219C.1 SW5C.3 T19C.1 | length 98.4
  Top Layer w0.25: T19C.1@12.75,34.15 12.95,34.15 13.765,34.965 13.835,34.965 R219C.1@14,35.13 14.98,35.13 C95C.2@15,35.15 ; R219C.1@13.8,35.2 R219C.1@13.93,35.2 ; C95C.2@15,35.2 15.069,35.131 15.656,35.131 v1(15.675,35.112) ; SW5C.3@39.25,5.97 40.67,5.97 v1(41.2,6.5) ; v1(44,30.4) 44.045,30.355 IC10C.5@58.382,30.355
  Bottom Layer w0.25: R212C.1@-2.33,39 -2.3,38.97 -2.3,35.528 -1.242,34.47 ccw(c-1.065,34.647) -1.241,34.469 12.969,34.469 13.612,35.112 v1(15.675,35.112) 40.688,35.112 44,31.8 v1(44,30.4) 44,9.3 v1(41.2,6.5)
TERM_IO0D: B8D.1 C95D.2 IC10D.5 R212D.1 R219D.1 SW5D.3 T19D.1 | length 125.6
  Top Layer w0.25: R219D.1@15.107,15.221 15.128,15.2 20.532,15.2 20.632,15.1 v3(20.7,15.1) ; v3(71.4,5.1) 74.23,2.27 SW5D.3@75.55,2.27 78.57,2.27 80.5,4.2 87.1,4.2 88.906,6.006 88.906,7.906 89.1,8.1 89.1,12.6 89.945,13.445 IC10D.5@89.945,14.482
  Top Layer w0.5: T19D.1@12.95,14.55 13.025,14.625 13.176,14.625 13.733,15.182 14.127,15.182 C95D.2@14.187,15.242 14.204,15.26 R219D.1@15.084,15.26
  Bottom Layer w0.25: R212D.1@-2.3,18.959 -2.3,15.4 -1.385,14.485 6.885,14.485 7.8,15.4 11.7,15.4 12.545,14.555 13.126,14.555 ; 13.171,14.574 20.174,14.574 v3(20.7,15.1) 20.748,15.148 20.919,15.148 20.971,15.2 22.849,15.2 37.897,0.152 53.184,0.152 60.003,6.971 68.629,6.971 70.287,5.313 B8D.1@70.287,5.201 ; B8D.1@70.287,5.1 v3(71.4,5.1)
TERM_IO1A: B9A.1 C100A.2 IC10A.7 R213A.1 R218A.1 SW5A.4 T20A.1 | length 135.1
  Top Layer w0.25: R213A.1@-3.806,81.889 -3.641,81.724 -3.603,81.724 -3.1,81.221 v1@-3.1,79.821 ; v1@11.694,67.2 T20A.1@12.783,67.2 C100A.2@15.1,67.2 ; v1(68.854,82.513) 68.921,82.58 69.48,82.58 71.493,84.593 B9A.1@71.493,84.752 71.652,84.752 72.315,85.415 72.315,86.451 SW5A.4@72.493,86.63 ; SW5A.4@72.293,86.63 SW5A.4@72.493,86.63 ; IC10A.7@86.659,75.34 86.659,82.741 83.8,85.6 75.5,85.6 74.47,86.63 SW5A.4@72.493,86.63
  Bottom Layer w0.25: v1(-3.1,79.8) -4.2,78.7 -4.2,75.3 -2.7,73.8 -0.4,73.8 0.2,74.4 1.9,74.4 9,67.3 v1(11.5,67.3) 24.9,67.3 28,70.4 28,81.1 36,89.1 52.1,89.1 58.687,82.513 v1(68.854,82.513)
TERM_IO1B: B9B.1 C100B.2 IC10B.7 R213B.1 R218B.1 SW5B.4 T20B.1 | length 133.3
  Top Layer w0.25: R213B.1@-3.773,61.837 -3.773,61.835 -3.611,61.672 -3.608,61.672 -3.1,61.164 v1@-3.1,59.821 ; v1@11.694,47.2 T20B.1@12.783,47.2 12.953,47.03 R218B.1@14.1,47.03 14.154,47.084 C100B.2@15.094,47.084 ; C100B.2@15.094,47.011 15.279,46.826 15.39,46.826 15.716,46.5 24.997,46.5 ; SW5B.4@38.75,82.93 39.155,82.525 39.675,82.525 41,81.2 41,68 36.89,63.89 28.406,63.89 24.331,59.815 24.331,54.615 24.929,54.017 24.929,45.915 39.215,45.915 44.4,51.1 44.4,54.15 B9B.1@51.334,61.084 52.495,61.084 54.723,63.312 IC10B.7@58.702,63.312
  Bottom Layer w0.25: v1(-3.1,59.8) -4.2,58.7 -4.2,55.3 -2.9,54 -0.6,54 -0.224,54.376 1.924,54.376 9,47.3 v1(11.5,47.3)
TERM_IO1C: B9C.1 C100C.2 IC10C.7 R213C.1 R218C.1 SW5C.4 T20C.1 | length 100.3
  Top Layer w0.25: R213C.1@-3.779,40.048 -3.771,40.048 -3.606,39.883 -3.606,39.875 -3.1,39.369 v1@-3.1,38.021 ; v1(11.5,25.5) 11.595,25.5 11.694,25.4 T20C.1@12.783,25.4 14.099,25.4 15.093,25.4 40.5,25.4 ; SW5C.4@39.25,3.43 40.83,3.43 43.175,5.775 43.175,22.726 40.5,25.4 ; IC10C.7@58.382,27.815 B9C.1@49,27.815 42.915,27.815 40.5,25.4
  Bottom Layer w0.25: v1(-3.1,38) -3.1,37.963 -4.2,36.863 -4.2,33.5 -2.9,32.2 -0.452,32.2 0.065,32.717 1.783,32.717 9,25.5 v1(11.5,25.5)
TERM_IO1D: B9D.1 C100D.2 IC10D.7 R213D.1 R218D.1 SW5D.4 T20D.1 | length 127.8
  Top Layer w0.25: v1(-3.929,18.287) -3.876,18.287 -3.33,18.834 R213D.1@-3.33,22.1 ; v1(11.7,5.8) 12.882,5.8 13.083,5.8 13.283,6 13.283,6.016 13.429,6.162 17.138,6.162 17.523,5.777 B9D.1@21.623,5.777 28.675,-1.275 55.538,-1.275 62.852,6.039 67.661,6.039 73.952,-0.252 73.952,-0.27 SW5D.4@75.55,-0.27 77.73,-0.27 81.478,3.478 87.699,3.478 89.6,5.378 89.6,7.441 92.035,9.876 92.035,12.592 92.485,13.042 IC10D.7@92.485,14.482
  Bottom Layer w0.2: v1(-3.929,18.287) -3.929,12.929 -3.1,12.1 -0.556,12.1 -0.156,12.5 1.6,12.5 8.119,5.981
  Bottom Layer w0.25: 8.119,5.981 8.3,5.8 v1(11.7,5.8)
pads on no net: FTG1.FTG2 FTG2.1 FTG3.1 FTG4.1 FTG5.1 FTG6.1 IC1A.8 IC1B.8 IC1C.8 IC1D.8 IC12A.8 IC12B.8 IC12C.8 IC12D.8 IC50A.1 IC50A.3 IC50A.4 IC50A.6 IC50A.19 IC50A.20 IC50A.22 IC50A.23 IC50B.1 IC50B.3 IC50B.4 IC50B.6 IC50B.19 IC50B.20 IC50B.22 IC50B.23 IC50C.1 IC50C.3 IC50C.4 IC50C.6 IC50C.19 IC50C.20 IC50C.22 IC50C.23 IC50D.1 IC50D.3 IC50D.4 IC50D.6 IC50D.19 IC50D.20 IC50D.22 IC50D.23 IC52A.3 IC52A.4 IC52A.7 IC52A.10 IC52A.14 IC52B.3 IC52B.4 IC52B.7 IC52B.10 IC52B.14 IC52C.3 IC52C.4 IC52C.7 IC52C.10 IC52C.14 IC52D.3 IC52D.4 IC52D.7 IC52D.10 IC52D.14 IC53A.3 IC53A.4 IC53A.7 IC53A.10 IC53A.14 IC53B.3 IC53B.4 IC53B.7 IC53B.10 IC53B.14 IC53C.3 IC53C.4 IC53C.7 IC53C.10 IC53C.14 IC53D.3 IC53D.4 IC53D.7 IC53D.10 IC53D.14 J1. J1.MECH1 J1.MECH2 LD15A.3 LD15B.3 LD15C.3 LD15D.3 LD16A.3 LD16B.3 LD16C.3 LD16D.3

## Polygon pours and split planes (outlines as drawn)
GND_ISOA on Top Layer "P5V0_ISOA" (solid, pour order 51): 95.775,79.7 103.2,79.7 103.7,79.2 103.7,78.3 103.2,77.8 95.775,77.8
P5V0_ISOA on Top Layer "P5V0_ISOA" (solid, pour order 23): 92.795,85 94.995,82.8 103.2,82.8 103.7,82.3 103.7,80.5 103.266,80.066 97.534,80.066 97,80.6 89.835,80.6 88.495,81.94 88.495,83.627 89.867,85
NetIC1C_2 on Top Layer "NONET_L03_P-001" (solid, pour order 30): 62.2,21.4 62.6,21 63.8,21 64.5,21.7 64.5,24 64.7,24.2 73.3,24.2 73.8,24.7 73.8,27 73.1,27.7 69,27.7 67.5,26.2 67.5,25.6 67.1,25.2 63.2,25.2 62.2,24.2
P5V0_ISOD on Top Layer "NONET_L03_P-001" (solid, pour order 10): 101.6,5.3 101,4.7 91.9,4.7 89.9,6.7 89.9,7.2 92.2,9.5 94.4,9.5 94.8,9.1 94.8,8.7 95.2,8.3 100.4,8.3 101.6,7.1
NetIC1D_2 on Top Layer "NONET_L03_P-001" (solid, pour order 38): 101.619,30.002 102.009,30.392 104.5,30.392 104.5,21.5 104.2,21.2 102.3,21.2 101.619,21.881
P12V0 on Top Layer "NONET_L03_P-001" (solid, pour order 39): 112.249,61.249 112,61 111,61 110.5,61.5 105.6,61.5 105,62.1 105,65.09 112.486,65.09 112.486,62.867 112.249,62.63
P12V0 on Top Layer "NONET_L03_P-001" (solid, pour order 29): 72.3,54 72.7,53.6 72.7,51.72 71.66,50.679 71.66,48.172 71.388,47.9 70.6,47.9 70.3,47.6 70.3,46.4 70,46.1 67.7,46.1 66.7,47.1 66.7,53.2 67.5,54
P12V0 on Top Layer "NONET_L03_P-001" (solid, pour order 37): 108.54,32.5 108,33.04 108,34 107.5,34.5 105.5,34.5 105,34 105,26 106,25 109.5,25 112,27.5 112,31 110.5,32.5
NetIC1A_2 on Top Layer "NONET_L03_P-001" (solid, pour order 36): 109.5,67 109,66.5 104.659,66.5 104.159,67 103.659,67.5 101,67.5 100.5,68 100.5,69.6 101.4,70.5 108.661,70.5 109.5,69.661
P12V0 on Top Layer "NONET_L03_P-001" (solid, pour order 31): 76.9,23.7 77.5,23.1 77.5,20.2 76.7,19.4 70.9,19.4 69.2,21.1 69.2,23.468 69.432,23.7
NetIC1B_2 on Top Layer "NONET_L03_P-001" (solid, pour order 28): 60.8,60.3 62.5,60.3 62.9,59.9 62.9,57.3 63.7,56.5 66.4,56.5 68,58.1 68.1,58 72.2,58 72.4,57.8 72.4,55.3 71.7,54.6 62.4,54.6 60.6,56.4 60.6,59.95
NetIC1B_5 on Top Layer "NONET_L03_P-001" (solid, pour order 27): 50.5,50.1 50.5,46.6 50.9,46.2 57.2,46.2 57.8,46.8 57.8,49.6 56.7,50.7 50.9,50.7 50.4,50.2
P5V0_ISOB on Top Layer "NONET_L03_P-001" (solid, pour order 16): 49.7,46.8 49.7,52.1 48.7,53.1 48.7,53.8 48.4,54.1 46.5,54.1 45.7,53.3 45.7,49.7 46.9,48.5 46.9,46.3 47.1,46.1 49,46.1
GND_ISOB on Top Layer "NONET_L03_P-001" (solid, pour order 15): 56.1,61.05 55.5,60.45 55.5,56.757 55.815,56.45 57.6,56.45 59.1,57.95 59.1,59.85 57.9,61.05
P5V0_ISOC on Top Layer "NONET_L03_P-001" (solid, pour order 13): 50.954,18.749 51.354,18.349 51.354,12.049 50.954,11.649 50.954,10.85 47.953,10.85 46.654,12.149 46.654,17.249 48.154,18.749
NetIC1D_5 on Top Layer "NONET_L03_P-001" (solid, pour order 9): 100.373,14.727 101.673,13.427 101.673,8.627 101.573,8.527 96.973,8.527 96.973,13.427 98.273,14.727
GND_ISOD on Layer 1 "GND_ISOD" (solid, pour order 21): 77.5,15.6 78.1,15 78.1,10.986 78.703,10.383 88.631,10.383 89.1,10.852 89.1,15.108 89.525,15.532 89.557,15.5 94.2,15.5 96.3,17.6 96.3,23.859 97.46,25.019 98.781,25.019 100.1,23.7 100.1,15 101.7,13.4 101.7,5.3 101.3,4.9 94.3,4.9 88.1,-1.3 64.759,-1.3 63.459,-2.6 22.659,-2.6 15.159,4.9 -3.441,4.9 -4.641,6.1 -4.641,20.9 -2.841,22.7 33.441,22.7 36.1,20.041 36.1,2.533 37.433,1.2 49.181,1.2 57.302,9.322 69.021,9.322 75.299,15.6
GND_ISOC on Layer 1 "GND_ISOC" (solid, pour order 20): 52.6,43.3 53.983,41.917 53.983,31.717 54.4,31.3 58.571,31.3 59.4,30.439 59.4,23.7 60.55,22.55 60.55,12.239 59.011,10.7 56.672,10.7 49.174,3.203 48.672,2.7 38.067,2.7 37.8,2.967 37.8,20.6 34,24.4 -4.588,24.4 -5,24.812 -5,42.498 -4.198,43.3
GND_ISOB on Layer 1 "GND_ISOB" (solid, pour order 19): 53.241,77.6 53.8,77.041 53.8,67.267 54.267,66.8 58.9,66.8 59.5,66.2 59.5,61.6 59.1,61.2 59.1,47.7 57.1,45.7 -4.3,45.7 -5,46.4 -5,63.4 -4.1,64.3 34.4,64.3 37.9,67.8 37.9,85.982 38.176,86.258 48.142,86.258 49.7,84.7 49.7,84.6 49.8,84.5 49.8,80.3 52.5,77.6
GND_ISOA on Layer 1 "GND_ISOA" (solid, pour order 14): 72.767,79.3 73,79.533 73,80.412 73.371,80.783 83.584,80.783 83.794,80.573 83.803,75.597 84.855,74.545 89.822,74.545 91.567,72.8 97.471,72.8 103.383,72.8 104.3,73.717 104.3,81.9 102.9,83.3 95.385,83.3 91.9,86.838 91.9,90 91.2,90.7 21.9,90.7 15.2,84 -3.1,84 -5,82.1 -5,66.6 -4.4,66.2 34,66.2 36.1,68.3 36.1,86.7 37.1,87.7 48.8,87.7 51.3,85.2 51.3,84.4 56.4,79.3
GND on Layer 1 "NONET_L03_P-001" (solid, remove dead copper, pour order 40): 83.9,69.7 84.835,70.635 89.761,70.635 90.105,71 103.079,71 104.991,72.912 105.033,83.367 103.307,85.093 103.307,90.007 104.543,91.243 128.657,91.243 130.094,89.806 136,83.9 136,6.1 127.9,-1.9 126.2,-1.9 104.645,-1.9 103.4,-0.655 103.4,13.269 100.7,15.969 100.7,24.243 99.438,25.505 97.205,25.505 95.661,23.961 95.396,23.961 95.396,19.696 95.281,19.581 94.816,19.1 89.484,19.1 89.179,19.404 89.2,23.975 88.691,24.483 78.852,24.483 78.2,23.831 78.2,19.86 75.8,17.459 75.019,17.459 68.367,10.808 67,10.8 66.99,10.81 65.09,10.81 64.6,11.3 64.6,15.461 62.3,17.761 62.3,24.301 62.687,24.689 62.687,30.608 63.379,31.3 67.6,31.3 68.158,31.859 68.158,41.629 64.087,45.7 62.799,45.7 60.25,48.248 60.3,48.3 60.3,60.2 61.385,61.285 62.627,61.267 63.425,62.064 63.425,66.797 67.474,66.797 67.883,67.206 67.883,75.594 67.8,75.678 67.8,78 68,78.2 72.7,78.2 72.9,78 72.9,67.149 73.332,66.717 83.296,66.717 83.9,67.321
P5V0_ISOD on Layer 2 "P5V0_ISOD" (solid, pour order 54): 77.5,15.6 78.1,15 78.1,10.986 78.703,10.383 88.631,10.383 89.1,10.852 89.1,15.108 89.525,15.532 89.557,15.5 94.2,15.5 96.3,17.6 96.3,23.859 97.46,25.019 98.781,25.019 100.1,23.7 100.1,15 101.7,13.4 101.7,5.3 101.3,4.9 94.3,4.9 88.1,-1.3 64.759,-1.3 63.459,-2.6 22.659,-2.6 15.159,4.9 -3.441,4.9 -4.641,6.1 -4.641,20.9 -2.841,22.7 33.441,22.7 36.1,20.041 36.1,2.533 37.433,1.2 49.181,1.2 57.302,9.322 69.021,9.322 75.299,15.6
P5V0_ISOC on Layer 2 "P5V0_ISOC" (solid, pour order 53): 52.6,43.3 53.983,41.917 53.983,31.717 54.4,31.3 58.571,31.3 59.4,30.439 59.4,23.7 60.55,22.55 60.55,12.239 59.011,10.7 56.672,10.7 49.174,3.203 48.672,2.7 38.067,2.7 37.8,2.967 37.8,20.6 34,24.4 -4.588,24.4 -5,24.812 -5,42.498 -4.198,43.3
P5V0_ISOB on Layer 2 "P5V0_ISOB" (solid, pour order 49): 53.241,77.6 53.8,77.041 53.8,67.267 54.267,66.8 58.9,66.8 59.5,66.2 59.5,61.6 59.1,61.2 59.1,47.7 57.1,45.7 -4.3,45.7 -5,46.4 -5,63.4 -4.1,64.3 34.4,64.3 37.9,67.8 37.9,85.982 38.176,86.258 48.142,86.258 49.7,84.7 49.7,84.6 49.8,84.5 49.8,80.3 52.5,77.6
P5V0_ISOA on Layer 2 "P5V0_ISOA" (solid, pour order 45): 72.767,79.3 73,79.533 73,80.412 73.371,80.783 83.584,80.783 83.794,80.573 83.803,75.597 84.855,74.545 89.822,74.545 91.567,72.8 97.471,72.8 103.383,72.8 104.3,73.717 104.3,81.9 102.9,83.3 95.385,83.3 91.9,86.838 91.9,90 91.2,90.7 21.9,90.7 15.2,84 -3.1,84 -5,82.1 -5,66.6 -4.4,66.2 34,66.2 36.1,68.3 36.1,86.7 37.1,87.7 48.8,87.7 51.3,85.2 51.3,84.4 56.4,79.3
P3V3 on Layer 2 "NONET_L03_P-001" (solid, remove dead copper, pour order 56): 83.904,69.704 84.835,70.635 89.772,70.635 90.137,71 103.8,71 105.696,72.896 105.736,82.664 103.3,85.1 103.3,90 104.8,91.5 127.5,91.5 134.6,84.4 134.6,4.8 127.9,-1.9 104.616,-1.9 103.3,-0.584 103.3,14.066 101.793,15.573 101.793,23.15 99.438,25.505 97.205,25.505 94.827,23.127 94.827,19.089 89.484,19.1 89.179,19.404 89.179,23.954 89.2,23.975 88.691,24.483 78.852,24.483 78.2,23.831 78.2,19.86 75.8,17.459 75.016,17.456 68.336,10.776 65.095,10.776 64.604,11.267 64.604,15.457 62.3,17.761 62.3,24.301 62.687,24.689 62.687,30.608 63.379,31.3 67.6,31.3 68.056,31.756 68.056,41.708 64.064,45.7 62.77,45.7 60.6,47.869 60.6,60.463 61.247,61.11 62.997,61.097 63.477,61.577 63.477,66.732 63.542,66.797 67.502,66.797 67.806,67.1 67.806,77.581 68.392,78.167 72.116,78.167 72.92,77.363 72.92,67.138 73.261,66.797 83.461,66.797 83.904,67.241
P12V0 on Layer 2 "Layer 2-P12V0" (solid, pour order 55): 71.182,19.418 75.218,19.418 76.108,20.308 76.088,22.595 74.3,24.383 74.3,34.2 83.8,43.7 101.6,43.7 105.638,39.662 105.638,31.762 108.7,28.7 111.5,28.7 112.1,29.3 112.094,30.169 108.7,33.634 108.7,41.1 110.6,43 116.4,43 116.437,43.038 131.238,43.038 132.326,44.126 132.326,45.45 131.176,46.6 114.622,46.6 112.3,48.922 112.3,65.476 111.873,65.903 105.303,65.903 104.934,65.534 104.934,55.2 101.6,51.866 67.542,51.697 66.67,50.824 66.667,47.141 68.352,45.45 72.35,45.45 74.3,43.5 74.3,40.514 70.4,36.551 70.4,20.2
P3V3 on Bottom Layer "P3V3" (solid, pour order 50): 130.2,47.9 130.849,47.9 131.37,47.379 131.37,46.631 130.516,46.631 130.2,46.947

## Keep-outs
Bottom Layer:
  region: 6.7,-3.5 -3.3,-3.5 -3.3,3.5 6.7,3.5
Keep-Out Layer:
  circle w0.15: c131,54.91 r0.45
  circle w0.15: c131.011,33.993 r0.45
  lines w0.15: -6,-2.5 -6,93.902
  lines w0.2: -5.007,3.675 -2.932,3.675
  lines w1: -6,-2.5 2.5,-2.5 5,-5 137,-5 137,93.9 64.4,93.9 64.398,93.902 -6,93.902

## Silkscreen, mask and mechanical layers (free items; w line width, h text height)
Top Overlay:
  lines w0.2: -4,84 -3.713,84.287 3.287,84.287 4,85 5.5,85
  text "<-On | Off->" at 71.693,91.46 h1
  text "Termination" at 82.9,91.4 h1
  text "T8" at 82.8,88.7 h1
  text "<-On | Off->" at 37.823,88.093 h1
  text "Termination" at 48.85,86.721 h1
  text "T9" at 83,86.1 h1
  text "T10" at 49,85 h1
  text "T11" at 49.1,82.6 h1
  text "TS 2026" at 79.822,46.515 h1.02
  text "DIO_8SMA_8MCX_MEZZ v.P_version" at 75.794,43.078 h1.6
  text "T12" at 49,5.4 h1
  text "Termination" at 75.011,4.593 h1
  text "T13" at 48.9,3 h1
  text "T14" at 85.9,1.7 h1
  text "Termination" at 38.3,0.2 h1
  text "T15" at 85.9,-0.9 h1
  text "<-On | Off->" at 38.2,-1.4 h1
  text "<-On | Off->" at 74.8,-3.7 h1
Bottom Overlay:
  drawing of 1234 lines, arcs and shapes, not listed
  text "Non-isolated" at 101.15,66.75 h1 r270
  text "Non-isolated" at 65.45,55.15 h1
  text "TS 2026" at 101.653,47.12 h1.02
  text "DIO_8SMA_8MCX_MEZZ v.P_version" at 114.503,43.713 h1.6
  text "Non-isolated" at 106.65,21.35 h1
  text "Non-isolated" at 67.35,16.45 h1
Mechanical 1:
  lines w0.1: -6,5.45 -6,83.45
  lines w0.15: -6,3.9 -6,85 1.9,85 ccw(c1.9,88.1) 5,88.1 5,93.9 94.5,93.9 94.5,88.9 ccw(c97.6,88.9) 100.7,88.9 100.7,93.9 137,93.9 137,-5 100.7,-5 100.7,0 ccw(c97.6,0) 94.5,0 94.5,-5 5,-5 5,0.8 ccw(c1.9,0.8) 1.9,3.9 -6,3.9
Mechanical 13:
  lines w0.01: -6.282,-6.334 -6.282,75.374

## Text inside footprints (layer, text, board x,y; h text height)
Logo2: Top Overlay "PN" at 97.934,49.15 h0.8
SW5A: Top Overlay "ON" at 75.165,85.741 h1 r90; Top Overlay "2" at 79.61,88.789 h1 r90; Top Overlay "1" at 79.61,86.503 h1 r90; Mechanical 14 "ON" at 75.165,85.741 h1 r90; Mechanical 14 "2" at 79.61,88.789 h1 r90; Mechanical 14 "1" at 79.61,86.503 h1 r90
SW5B: Top Overlay "ON" at 41.422,82.041 h1 r90; Top Overlay "2" at 45.867,85.089 h1 r90; Top Overlay "1" at 45.867,82.803 h1 r90; Mechanical 14 "ON" at 41.422,82.041 h1 r90; Mechanical 14 "2" at 45.867,85.089 h1 r90; Mechanical 14 "1" at 45.867,82.803 h1 r90
SW5C: Top Overlay "1" at 45.867,3.303 h1 r90; Top Overlay "2" at 45.867,5.589 h1 r90; Top Overlay "ON" at 41.422,2.541 h1 r90; Mechanical 14 "1" at 45.867,3.303 h1 r90; Mechanical 14 "2" at 45.867,5.589 h1 r90; Mechanical 14 "ON" at 41.422,2.541 h1 r90
SW5D: Top Overlay "1" at 82.667,-0.397 h1 r90; Top Overlay "2" at 82.667,1.889 h1 r90; Top Overlay "ON" at 78.222,-1.159 h1 r90; Mechanical 14 "1" at 82.667,-0.397 h1 r90; Mechanical 14 "2" at 82.667,1.889 h1 r90; Mechanical 14 "ON" at 78.222,-1.159 h1 r90